# Altium PCB LimeSDR-Mini_2v4_Rounded.PcbDoc (part 5 of 8)
Units mm, origin at the board's own origin, x right, y up, seen from the top; angles counter-clockwise.
Board outline 69 x 31.37 mm, 8 copper layers (Top, L2, L3, L4, L5, L6, L7, Bottom), stack 1.555 mm thick; 432 components, 292 nets, 1956 pads, 824 vias.
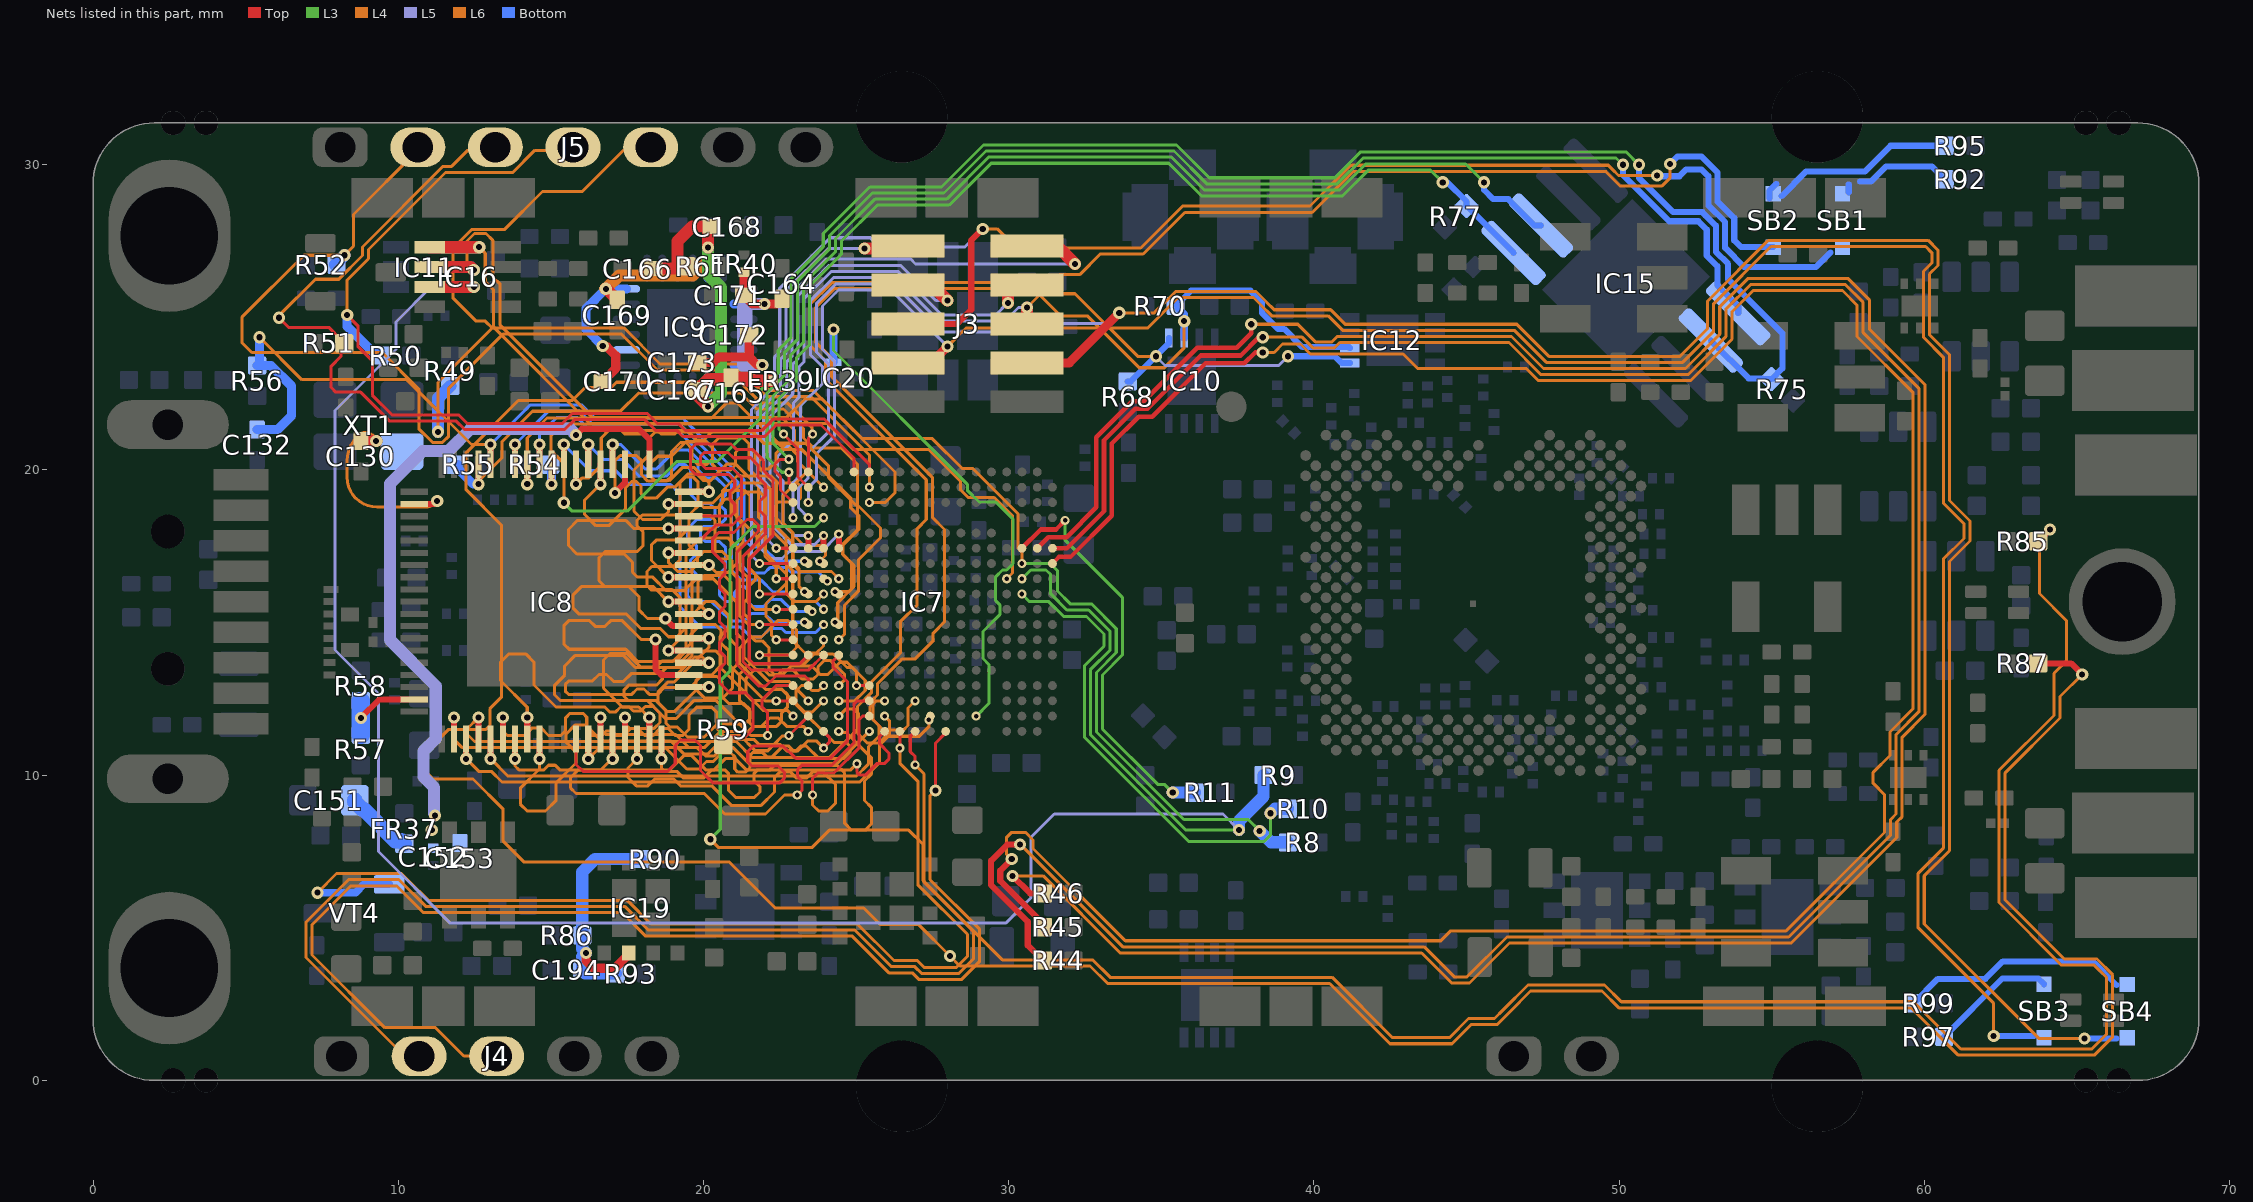
[diagram p9: the nets of this part, all layers, seen from the top]

## Via types
v1: diameter 0.4, hole 0.2, Top to Bottom, tented both sides, 543 vias
v2: diameter 0.3, hole 0.15, Top to Bottom, tented both sides, 160 vias
v3: diameter 0.35, hole 0.2, Top to Bottom, tented both sides, 60 vias
v4: diameter 0.35, hole 0.2, Top to Bottom, tented top, 28 vias
v5: diameter 0.5, hole 0.2, Top to Bottom, tented bottom, 25 vias
v6: diameter 0.5, hole 0.2, Top to Bottom, tented both sides, 8 vias

## Nets (pads, with @x,y where several pads share a name; then routed paths per layer and width w, separated by ;. In a path a pad name is that pad's centre, name@x,y a point inside that pad or via, vN(x,y) a via of type N, cw(c..) or ccw(c..) an arc to the next point about the centre after c; other vN are vias at no path point) (continued)
FT_RXFN: (continued)
  Bottom w0.1: v1(15.425,20.835) 16.285,19.975 17.125,19.975 17.575,19.525 18.925,19.525 19.225,19.225 19.225,15.525 19.9,14.85 21.225,14.85 21.55,14.525 21.9,14.525 22.175,14.8 22.575,14.8 22.7,14.675 23.675,14.675 v2(23.935,14.935)
FT_SIWUN: IC8.10 R54.1 | length 1.3
  Top w0.2: v1(15.025,19.535) IC8.10@15.025,20.185
  Bottom w0.3: R54.1@14.975,20.175 15.025,20.125 v1(15.025,19.535)
FT_TXEN: IC7.M16 IC8.8 | length 15.6
  Top w0.2: v1(15.825,19.535) IC8.8@15.825,20.185
  L6 w0.1: v1(15.825,19.535) 16.031,19.741 16.241,19.741 16.65,20.15 16.65,21.05 16.9,21.3 17.3,21.3 17.412,21.188 17.988,21.188 18.1,21.3 18.5,21.3 18.612,21.188 19.063,21.188 19.175,21.3 19.45,21.3 19.775,20.975 20,20.975 20.325,21.3 21.625,21.3 22.1,20.825 22.1,20.575 21.825,20.3 21.825,20.05 22.3,19.575 23.075,19.575 23.175,19.475 23.175,19.075 23.05,18.95 22.46,18.95 22.31,18.8 22.31,18.51 23.295,17.525 23.825,17.525 24,17.35 24,17.2 v2(23.81,17.01)
FT_VBUS: IC8.37 R57.1 R58.2 | length 3.1
  Top w0.2: v1(8.775,11.875) 9.385,12.485 IC8.37@10.525,12.485
  Bottom w0.6: R57.1@8.775,11.325 R58.2@8.775,12.425
FT_WAKEUPN: IC7.G15 IC8.16 R55.1 | length 23.5
  Top w0.2: v1(12.625,19.535) IC8.16@12.625,20.185
  L6 w0.1: v1(12.625,19.535) 12.625,19.625 13.4,20.4 13.4,20.925 14.4,21.925 17.275,21.925 17.875,22.525 21.225,22.525 21.75,22 22.625,22 23.275,21.35 23.275,21.051 23.601,20.725 24.512,20.725 25.05,20.187 25.05,18.85 25.8,18.1 25.8,17.775 25.075,17.05 25.075,16.025 24.625,15.575 24.625,14.625 v2(24.435,14.435)
  Bottom w0.3: R55.1@11.95,20.175 11.95,20.046 12.461,19.535 v1(12.625,19.535)
FT_WRN: IC7.J16 IC8.11 | length 14.8
  Top w0.2: IC8.11@14.625,20.185 v1(14.625,20.835)
  Bottom w0.1: v1(14.625,20.835) 14.625,21.15 15.2,21.725 15.85,21.725 16.275,21.3 19.15,21.3 20.925,19.525 20.925,16.7 21.225,16.4 21.875,16.4 22.275,16 22.7,16 23.015,15.685 23.685,15.685 v2(23.935,15.435)
FT_XI: C130.1 IC8.21 XT1.3 | length 7
  Top w0.2: IC8.21@10.525,18.885 11.175,18.885 v1(11.275,18.985)
  Top w0.4: C130.1@8.775,20.95 v1(9.275,20.95)
  L6 w0.1: v1@9.275,21.029 9.194,21.11 ccw(c8.916,20.832) 8.916,21.225 ccw(c8.916,20.884) 8.675,21.125 ccw(c9.52,20.28) 8.325,20.28 8.325,19.76 ccw(c9.3,19.76) 9.3,18.785 10.9,18.785 ccw(c10.9,19.208) 11.199,18.909 v1(11.275,18.985)